# Altium PCB Fast_Servo.PCBDOC (part 8 of 11)
Units mm, origin at the board's own origin, x right, y up, seen from the top; angles counter-clockwise.
Board outline 162.48 x 100 mm, 6 copper layers (Top, GP1(GND), L3, L4, P3V3, Bot), stack 1.716 mm thick; 668 components, 491 nets, 2308 pads, 1133 vias.
Unrouted connection lines stored in the file: 2.
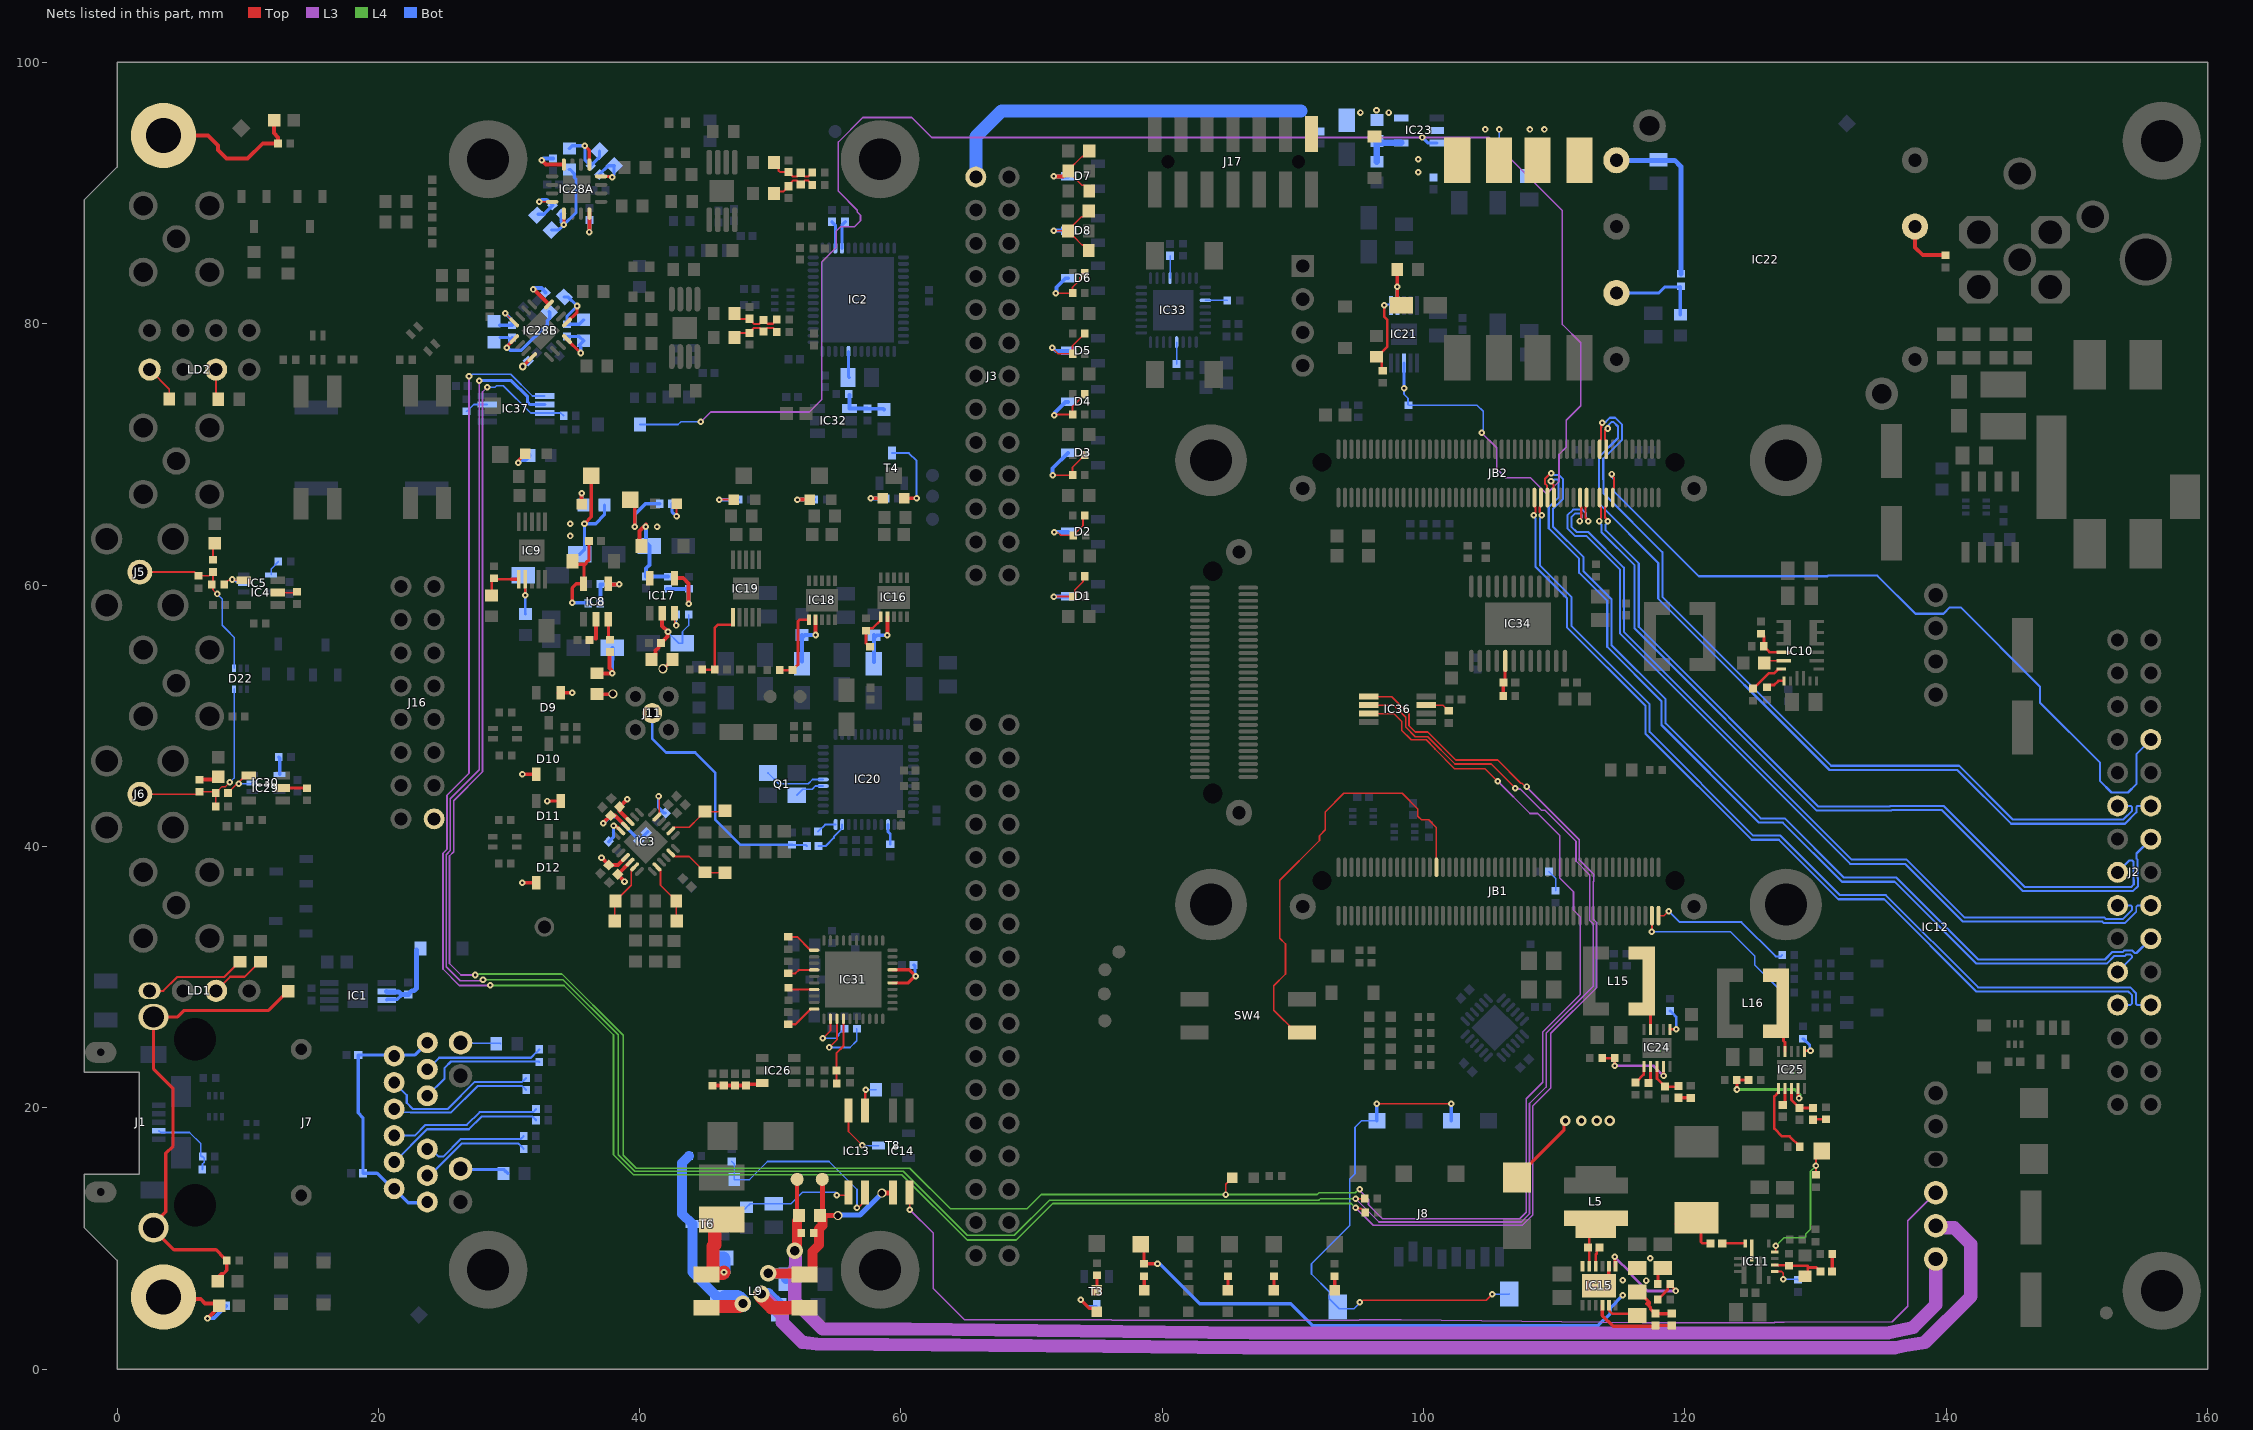
[diagram p10: the nets of this part, all layers, seen from the top]

## Via types
v1: diameter 0.5, hole 0.2, Top to Bot, tented both sides, 1045 vias
v2: diameter 0.8, hole 0.4, Top to Bot, tented both sides, 40 vias
v3: diameter 0.6, hole 0.3, Top to Bot, tented both sides, 27 vias
v4: diameter 1.27, hole 0.711, Top to Bot, tented both sides, 11 vias
v5: diameter 0.7, hole 0.5, Top to Bot, tented both sides, 10 vias

## Nets (pads, with @x,y where several pads share a name; then routed paths per layer and width w, separated by ;. In a path a pad name is that pad's centre, name@x,y a point inside that pad or via, vN(x,y) a via of type N, cw(c..) or ccw(c..) an arc to the next point about the centre after c; other vN are vias at no path point) (continued)
LVDS2_P: J2.8 JB2.86 | length 59
  Top w0.16: v1(114.39,68.503) 114.39,68.414 114.564,68.24 114.564,67.736 114.569,67.731 114.569,67.602 114.569,67.438 114.475,67.344 JB2.86@114.475,66.704
  Bot w0.16: v1(114.39,68.503) 114.39,68.283 114.557,68.116 114.557,67.19 121.067,60.68 130.911,60.68 130.961,60.729 134.726,60.729 137.645,57.81 139.791,57.81 140.279,58.298 141.101,58.298 147.177,52.222 147.177,51.012 151.754,46.435 151.754,45.021 152.645,44.13 153.908,44.13 154.545,44.767 154.545,47.069 J2.8@155.654,48.178
LVDS3_N: J2.12 JB2.83 | length 64.1
  Top w0.16: v1@113.885,71.895 113.885,71.132 113.975,71.042 JB2.83@113.975,70.404
  Bot w0.16: v1(114.104,71.988) 114.17,72.053 114.17,72.27 114.391,72.492 114.523,72.492 114.877,72.138 114.877,71.26 113.43,69.813 113.43,67.97 113.432,67.968 113.432,66.214 117.954,61.692 117.954,58.966 131.065,45.855 140.847,45.855 144.964,41.738 152.43,41.738 153.678,41.738 154.544,42.605 154.544,43.005 154.638,43.098 J2.12@155.654,43.098
LVDS3_P: J2.11 JB2.81 | length 64.4
  Top w0.16: JB2.81@113.475,70.404 113.475,71.042 113.565,71.132 113.565,72.027 113.596,72.058 113.596,72.367 v1(113.661,72.432)
  Bot w0.16: v1(113.661,72.432) 113.726,72.497 113.943,72.497 114.258,72.812 114.656,72.812 115.197,72.271 115.197,71.128 113.75,69.681 113.75,68.103 113.752,68.101 113.752,67.051 118.274,62.529 118.274,59.099 131.198,46.175 140.98,46.175 145.097,42.058 152.563,42.058 153.545,42.058 154.224,42.738 154.224,43.005 154.131,43.098 J2.11@153.114,43.098
LVDS4_N: J2.15 JB2.84 | length 60.8
  Top w0.16: JB2.84@113.975,66.704 113.975,66.066 113.885,65.976 113.885,65.171 114.1,64.956 v1(114.1,64.9)
  Bot w0.16: v1(114.1,64.9) 114.1,64.809 113.927,64.636 113.927,64.198 116.465,61.66 116.465,56.808 130.215,43.058 135.668,43.058 135.709,43.098 139.804,43.098 146.003,36.9 154.15,36.9 154.35,37.1 154.35,37.446 154.327,37.469 154.327,38.837 154.234,38.931 154.027,38.931 J2.15@153.114,38.018
LVDS4_P: J2.14 JB2.82 | length 62.4
  Top w0.16: v1(113.435,64.904) 113.435,64.996 113.565,65.127 113.565,65.976 113.475,66.066 JB2.82@113.475,66.704
  Bot w0.16: v1(113.435,64.904) 113.435,64.813 113.607,64.641 113.607,64.065 116.145,61.528 116.145,56.676 130.083,42.738 135.8,42.738 135.841,42.778 139.672,42.778 145.87,36.58 154.283,36.58 154.67,36.967 154.67,37.579 154.647,37.601 154.647,38.98 154.559,39.069 154.559,39.463 J2.14@155.654,40.558
LVDS5_N: J2.18 JB2.78 | length 66.2
  Top w0.16: JB2.78@112.475,66.704 112.475,66.066 112.385,65.976 112.385,65.171 112.6,64.956 v1(112.6,64.9)
  Bot w0.152: v1(112.6,64.9) 112.6,64.986 112.423,65.163 112.423,65.512 112.152,65.784 111.444,65.784 110.996,65.336 110.996,64.349 111.592,63.753 112.472,63.753 115.013,61.212 115.013,56.306 132.644,38.674 136.843,38.674 141.263,34.254 151.947,34.254 152.063,34.138 153.669,34.138 154.54,35.009 154.54,35.389 154.629,35.478 J2.18@155.654,35.478
  Bot w0.16: v1@112.6,64.853 v1(112.6,64.9)
LVDS5_P: J2.17 JB2.76 | length 64.1
  Top w0.16: v1(111.935,64.904) 111.935,64.996 112.065,65.127 112.065,65.976 111.975,66.066 JB2.76@111.975,66.704
  Bot w0.152: v1(111.935,64.904) 111.935,64.991 112.111,65.168 112.111,65.382 112.022,65.472 111.573,65.472 111.308,65.206 111.308,64.478 111.721,64.065 112.601,64.065 115.325,61.341 115.325,56.435 132.774,38.986 136.973,38.986 141.392,34.566 152.076,34.566 152.192,34.45 153.54,34.45 154.228,35.139 154.228,35.389 154.139,35.478 J2.17@153.114,35.478
  Bot w0.16: v1@111.935,64.812 v1(111.935,64.904)
LVDS6_N: J2.21 JB2.68 | length 70.2
  Top w0.16: v1(109.75,67.95) 109.75,67.858 109.948,67.66 109.948,66.731 JB2.68@109.975,66.704 JB2.68@110.002,66.731
  Bot w0.16: v1(109.75,67.95) 109.842,67.95 109.99,68.098 110.24,68.098 110.334,68.004 110.334,66.719 109.575,65.96 109.575,64.355 111.905,62.025 111.905,60.945 114.055,58.795 114.055,55.27 118.205,51.12 118.205,49.292 125.672,41.825 127.497,41.825 132.022,37.3 136.047,37.3 142.316,31.031 152.276,31.031 152.857,31.611 153.664,31.611 153.768,31.715 154.111,31.715 154.205,31.622 154.205,31.489 J2.21@153.114,30.398
LVDS6_P: J2.20 JB2.66 | length 71.3
  Top w0.16: JB2.66@109.461,66.718 JB2.66@109.475,66.704 109.448,66.731 109.448,67.606 109.293,67.761 109.293,68.139 109.731,68.577 v1(109.757,68.577)
  Bot w0.16: v1(109.757,68.577) 109.849,68.577 110.008,68.418 110.373,68.418 110.654,68.137 110.654,66.586 109.895,65.828 109.895,64.488 112.225,62.158 112.225,61.078 114.375,58.928 114.375,55.403 118.525,51.253 118.525,49.425 125.805,42.145 127.63,42.145 132.155,37.62 136.18,37.62 142.449,31.351 152.144,31.351 152.724,31.931 153.532,31.931 153.635,32.035 154.244,32.035 154.431,31.848 154.564,31.848 J2.20@155.654,32.938
LVDS7_N: J2.24 JB2.64 | length 69.1
  Top w0.16: JB2.64@108.975,66.704 108.975,66.066 108.885,65.976 108.885,65.613 109.05,65.447 v1(109.05,65.355)
  Bot w0.16: v1(109.05,65.355) 109.05,65.263 108.897,65.11 108.897,61.515 111.308,59.104 111.308,56.884 117.301,50.892 117.301,48.765 125.233,40.833 127.317,40.833 131.871,36.278 135.379,36.278 142.445,29.212 148.479,29.212 148.485,29.218 153.678,29.218 153.684,29.212 154.083,29.212 154.52,28.775 154.52,27.975 154.637,27.858 J2.24@155.654,27.858
LVDS7_P: J2.23 JB2.62 | length 69
  Top w0.16: v1(108.423,65.355) 108.423,65.447 108.565,65.589 108.565,65.976 108.475,66.066 JB2.62@108.475,66.704
  Bot w0.16: v1(108.423,65.355) 108.423,65.263 108.577,65.11 108.577,61.383 110.988,58.972 110.988,56.752 116.981,50.759 116.981,48.632 125.1,40.513 127.184,40.513 131.739,35.958 135.247,35.958 142.313,28.892 148.612,28.892 148.618,28.898 153.545,28.898 153.551,28.892 153.95,28.892 154.2,28.642 154.2,27.975 154.083,27.858 J2.23@153.114,27.858
MIO0: J8.9 | length 39.9
  Top w0.125: v1(95.116,5.129) 95.217,5.129 95.359,5.27 104.79,5.27 v1(105.25,5.73) ; v1(96.42,20.32) v1(102.12,20.32)
  Bot w0.125: v1(95.116,5.129) 95.116,5.056 94.676,4.617 93.553,4.617 92.783,5.388 92.783,5.915 91.42,7.277 91.42,8.059 94.353,10.991 94.353,14.547 94.75,14.944 94.75,18.5 95.25,19 J8.9@96.42,19 ; v1(105.25,5.73) 106.53,5.73 J8.9@106.55,5.75
  Bot w0.25: J8.9@96.42,19 v1(96.42,20.32) ; J8.9@102.12,19 v1(102.12,20.32)
MODE: JB1.31 SW4.3 | length 33.6
  Top w0.125: SW4.3@90.707,25.757 90.243,25.757 88.529,27.471 88.529,29.331 89.431,30.232 89.431,32.539 88.993,32.977 88.993,37.413 92.029,40.449 92.029,40.826 92.475,41.271 92.475,42.641 93.896,44.062 98.359,44.062 99.549,42.873 99.549,42.322 99.835,42.037 100.385,42.037 100.975,41.447 JB1.31@100.975,38.404
N2V5A: C56.1 C57.2 C59.2 C64.1 C65.2 C67.2 C101.2 C102.2 D9.1 D10.1 D11.1 D12.1 D24.2 IC3.15 IC3.16 IC3.21 IC3.22 IC8.5 R111.2 R126.2 TP8.1 | length 34.8
  Top w0.254: v1(31.025,37.225) D12.1@32.075,37.225 ; v1(31.03,45.521) D10.1@32.08,45.521 ; v1(32.925,43.475) D11.1@33.975,43.475 ; D9.1@33.78,51.771 33.98,51.971 D9.1@33.98,51.771 ; D9.1@34.18,51.771 v1(34.847,51.771) ; v1(34.849,58.649) 34.849,59.785 35.159,60.095 IC8.5@35.703,60.095 35.742,60.134 35.742,61.558 35.693,61.607 35.072,61.607 D24.2@34.853,61.825 ; 35.78,61.607 35.845,61.607 35.928,61.69 35.928,61.755 36.125,61.952 36.125,63.359 C102.2@36.135,63.369 ; v1(35.78,64.706) 36.302,65.228 TP8.1@36.302,68.3
  Top w0.3: v1(37.08,39.145) 37.08,39.139 37.636,38.582 C59.2@37.636,38.576 38.343,38.576 IC3.21@38.916,39.148 ; v1(37.203,41.767) 37.203,41.779 C57.2@37.787,42.363 38.105,42.363 IC3.16@38.916,41.552 ; C65.2@38.284,37.877 v1@38.84,37.321 ; C65.2@38.317,37.873 38.335,37.873 39.257,38.794 IC3.22@39.269,38.794 ; v1(39.059,43.6) 39.042,43.6 38.476,43.035 C67.2@38.458,43.035 38.458,42.716 IC3.15@39.269,41.906
  Bot w0.254: v1(34.849,58.649) R126.2@36.267,58.649 ; C101.2@35.405,62.373 35.78,62.749 v1(35.78,64.706) 36.642,64.706 37.303,65.367 R111.2@37.303,66.129 ; v1@37.215,41.756 37.744,42.285 38.183,42.285 39.979,40.489 C64.1@40.615,41.125
  other v1: 38.84,37.314 34.7,63.761 34.7,64.706
N5V0A: C37A.2 C37B.2 C51A.2 C51B.2 C139.2 C140.2 D27.2 IC17.5 IC28A.4 IC28A.12 IC28B.4 IC28B.12 R113.2 R166.2 TP9.1 | length 22.9
  Top w0.3: v3@31.044,76.705 v3@31.044,76.715 ; v3(31.05,76.725) 31.044,76.719 v3@31.044,76.715 ; IC28B.12@31.783,77.455 v3@31.044,76.715 ; v1(31.852,82.629) 31.912,82.629 IC28B.4@33.056,81.485 ; v1(32.52,92.512) 32.845,92.187 IC28A.4@34.202,92.187 ; v1(36.152,87.022) IC28A.12@36.152,88.437 ; TP9.1@39.278,66.541 39.625,66.194 v1(39.625,64.456) ; D27.2@40,63 40,64.152 40.478,64.63 v1(40.478,64.456)
  Bot w0.3: v3@31.057,76.718 31.593,77.254 C37B.2@31.653,77.254 ; v1(31.852,82.629) 31.951,82.728 32.473,82.728 32.788,82.414 C51B.2@32.788,82.392 ; v1(32.52,92.512) 32.647,92.639 C51A.2@33.371,92.639 ; v1(36.152,87.022) C37A.2@36.152,87.955 ; v1(39.625,64.456) 39.625,65.402 40.454,66.231 R113.2@41.529,66.231 ; v1(40.478,64.456) 40.478,63.266 C139.2@40.749,62.995 40.749,61.54 40.499,61.29 C140.2@40.499,60.66 42.169,60.66 R166.2@42.174,60.655
  other v1: 41.332,64.456
N5V5: C103.1 C114.1 C192.2 C193.2 C201.1 D25.2 IC15.8 IC15.12 IC15.13 L18.1 L19.1 R109.2 R130.1 TP7.1 | length 57.5
  Top w0.25: TP7.1@78.581,9.835 TP7.1@78.598,9.818 ; TP7.1@78.601,10.008 R109.2@78.601,8.062 v1(79.632,8.062)
  Top w0.254: L18.1@36.741,51.659 37.937,51.659 v5@37.977,51.699 ; v5(41.785,53.602) 41.847,53.602 42.511,54.267 L19.1@42.511,54.317 ; D25.2@107.153,14.65 107.153,14.725 110.746,18.317 110.746,18.896 v2(110.85,19) ; IC15.13@113.425,6.37 114.175,7.12 IC15.8@114.175,7.87 ; C103.1@116.35,5.895 116.5,5.895 117.263,5.132 117.263,4.997 ; 117.075,4.997 117.105,4.997 117.359,4.742 117.359,4.622 C201.1@117.737,4.243 C114.1@118.987,4.243 ; R130.1@117.932,6.5 117.932,7.377 C193.2@118.3,7.745 118.397,7.745 C193.2@118.795,7.347
  Bot w0.254: v1(79.632,8.062) 79.81,8.062 82.871,5 89.825,5 91.51,3.315 113.342,3.315 114.273,4.245 114.273,4.668 v1(115.25,5.645)
  other v1: 117.028,6.778 115.25,6.799 117.359,8.47
  other v2: 112.081,19 113.25,19 114.25,19
  other v5: 37.957,51.679
N5V5_LDO2: C99.2 C100.2 IC8.2 L18.2 R125.1 | length 6.1
  Top w0.3: 36.635,55.904 36.644,55.914 36.644,57.386 IC8.2@36.653,57.395 ; L18.2@37.055,53.243 v1(37.898,53.243) 37.921,53.408 37.676,53.653 R125.1@37.676,54.947
  Bot w0.3: v1(37.898,53.243) 37.921,55.188 C100.2@37.903,55.206
N5V5_LDO5: C137.2 C138.2 IC17.2 L19.2 R165.1 | length 8.2
  Top w0.3: L19.2@40.886,54.479 41.023,54.479 41.211,54.667 41.211,54.981 41.464,55.234 41.464,55.401 C137.2@41.624,55.561 ; C137.2@41.724,55.661 C137.2@41.624,55.561 ; IC17.2@41.724,57.835 41.724,56.884 v1(42.169,56.439) 42.131,56.4 42.131,56.067 C137.2@41.624,55.561
  Bot w0.125: v1(42.169,56.439) 42.169,56.381 43,55.55 C138.2@43.275,55.55 43.275,56.443 43.744,56.912 R165.1@43.744,57.737
N12V0A: C182.2 C183.2 D29.2 IC23.5 J3.26 J16.16 R180.2 | length 28.8
  Bot w1: J3.26@65.73,91.24 65.73,94.318 67.687,96.275 90.599,96.275
  other v1: 95.167,96.169 97.317,96.169 96.393,96.342
N13V0: C180.2 C181.2 IC23.2 L14.2
  other v1: 99.575,91.61 99.58,92.58
N13V0FIL: C178.2 C179.2 L13.2 L14.1 | length 3
  Bot w0.125: C179.2@105.672,91.869 105.775,91.972 v1(105.775,94.875)
  other v1: 104.73,94.875 108.14,94.875 109.25,94.875
N13V0S: C177.2 IC22.4 L13.1 R179.1 | length 13.4
  Bot w0.381: IC22.4@114.75,92.516 119.216,92.516 119.7,92.032 R179.1@119.7,83.826
NC: J17.1
NetB1_1: B1.1 C122.2 IC14.1 L9.4 R145.1 R147.1 | length 18.3
  Top w0.381: B1.1@53.976,14.525 53.989,14.513 53.989,11.772 54.001,11.76 54.009,11.752 v5(55.175,11.752) ; v5(58.54,13.464) 59.342,13.464 IC14.1@59.381,13.503
  Top w0.762: v4@49.682,7.305 52.56,7.305 L9.4@52.62,7.244 53.02,7.244 53.239,7.463 53.239,8.992 53.735,9.488 53.735,10.735 54.001,11.001 R147.1@54.001,11.531
  Bot w0.381: v5(55.175,11.752) 55.214,11.79 56.867,11.79 58.507,13.431 v5(58.54,13.464)
  Bot w0.762: v4@50.153,7.312 50.999,7.312 51.193,7.118 C122.2@51.193,6.891
  other v4: 49.835,7.332
NetB2_1: B2.1 IC12.1 R145.2 R147.2 | length 101.4
  Top w0.3: R147.2@52.056,11.816 B2.1@52.056,14.525
  Top w0.762: v4@52.057,8.986 R147.2@52.057,11.351
  L3 w1.016: 51.873,7.704 51.873,5.198 54.005,3.066 60.675,3.066 86.748,2.769 86.753,2.769 135.576,2.769 135.685,2.793 137.464,3.189 139.2,4.925 IC12.1@139.2,8.425 ; v4(51.873,9.068) 51.921,9.019 51.921,7.704
NetC1_2: C1.2 D30.1 IC1.2 IC1.3 | length 6.8
  Bot w0.254: IC1.3@20.643,28.256 20.687,28.3 21.45,28.3 21.775,28.625
  Bot w0.381: IC1.2@20.643,28.906 20.678,28.872 21.553,28.872 21.744,28.681 C1.2@22.293,28.681 22.568,28.956 22.734,28.956 22.919,29.141 D30.1@22.919,32.067
NetC4_2: C4.2 IC31.34 R19.2 | length 5.2
  Top w0.16: R19.2@55.071,21.872 55.071,22.825 C4.2@55.051,22.845 55.051,24.175 55.601,24.725 IC31.34@55.601,26.805
NetC5_2: C5.2 IC31.5 IC31.7 | length 4.9
  Top w0.25: IC31.5@59.351,29.555 60.563,29.555 61.065,30.057 v1(61.128,30.057) 60.63,30.555 IC31.7@59.351,30.555
  Bot w0.25: C5.2@60.971,30.93 61.08,30.821 61.08,30.105 v1(61.128,30.057)
NetC6_2: C6.2 C9.2 C10.2 IC26.3 R21.2 | length 3.9
  Top w0.3: R21.2@45.58,21.695 48.141,21.695 48.249,21.803 49.285,21.803 IC26.3@49.382,21.901
NetC18_2: C18.2 D7.3 R37.2 R38.1 | length 7
  Top w0.125: R37.2@72.809,91.65 73.86,90.599 74.022,90.599 74.409,90.212 R38.1@74.409,90.162 ; R37.2@72.809,91.7 72.809,91.75 73.86,92.8 73.997,92.8 74.409,93.213 C18.2@74.409,93.238
  Top w0.3: v1(71.684,91.285) 72.395,91.285 72.459,91.35 72.509,91.35 72.809,91.65 R37.2@72.809,91.7
  Bot w0.3: v1(71.684,91.285) D7.3@72.784,91.285
NetC19_2: C19.2 D8.3 R35.2 R36.1 | length 6.8
  Top w0.125: v1(71.684,87.135) 71.705,87.115 R35.2@72.777,87.115 ; R36.1@74.377,85.594 74.377,85.644 73.989,86.031 73.86,86.031 73.214,86.677 73.164,86.677 72.777,87.065 R35.2@72.777,87.115 ; C19.2@74.377,88.635 74.377,88.61 73.964,88.198 73.81,88.198 72.777,87.165 R35.2@72.777,87.115
  Bot w0.3: v1(71.684,87.135) D8.3@72.784,87.135
NetC20_1: C20.1 IC2.17 | length 2.1
  Bot w0.25: C20.1@54.717,87.807 54.984,87.54 IC2.17@54.984,85.788
NetC21_1: C21.1 IC2.18 | length 2.1
  Bot w0.25: IC2.18@55.484,85.788 55.484,87.54 C21.1@55.751,87.807
NetC25_2: C25.2 IC2.48 | length 2
  Bot w0.25: IC2.48@55.984,77.888 55.984,75.933 C25.2@56.034,75.883
NetC34_2: C34.2 C35.2 IC32.4 R39.1 | length 3.7
  Bot w0.3: R39.1@56.045,74.55 56.045,73.555 IC32.4@56.075,73.525 56.087,73.512 57.412,73.512 C35.2@57.425,73.5 58.641,73.5 C34.2@58.698,73.443
NetC40A_1: C40A.1 IC28A.1 R44A.1 R48A.2 | length 6
  Top w0.25: v1(35.81,93.622) 36.152,93.279 IC28A.1@36.152,92.187
  Bot w0.25: R48A.2@34.621,93.414 34.828,93.622 v1(35.81,93.622) 35.81,92.54 R44A.1@36.256,92.093 36.925,92.761 C40A.1@36.925,93.228
NetC40A_2: C40A.2 IC28A.16 R44A.2 | length 3.2
  Top w0.25: IC28A.16@37.052,91.287 37.062,91.278 37.751,91.278 37.826,91.203 v1(37.894,91.203)
  Bot w0.25: R44A.2@36.921,91.428 37.589,92.096 C40A.2@38.056,92.096 38.038,92.079 38.038,91.415 37.894,91.271 v1(37.894,91.203)
NetC40B_1: C40B.1 IC28B.1 R44B.1 R48B.2 | length 6
  Top w0.25: IC28B.1@34.435,80.106 35.207,80.879 v1(35.207,81.363)
  Bot w0.25: R48B.2@34.219,82.057 34.513,82.057 v1(35.207,81.363) 34.442,80.598 R44B.1@34.442,79.966 35.387,79.966 C40B.1@35.717,80.296
NetC40B_2: C40B.2 IC28B.16 R44B.2 | length 4
  Top w0.25: IC28B.16@34.435,78.833 v1@35.502,77.766
  Bot w0.25: R44B.2@34.442,79.026 35.387,79.026 C40B.2@35.717,78.696 35.386,78.365 35.502,78.249 v1(35.502,77.765)
NetC41A_1: C41A.1 C43A.2 R47A.1 R201A.2 | length 3.7
  Top w0.16: R201A.2@50.275,89.987 50.428,90.14 51.015,90.14 51.266,90.391 C41A.1@51.266,90.499 ; C41A.1@51.4,90.525 51.63,90.755 51.63,90.86 51.724,90.954 52.04,90.954 C43A.2@52.33,90.664 52.625,90.959 52.821,90.959 52.824,90.956 52.917,90.956 53.215,90.657 R47A.1@53.215,90.637
NetC41B_1: C41B.1 C43B.2 R47B.1 R201B.2 | length 3.9
  Top w0.16: R201B.2@47.265,78.957 47.613,79.305 C41B.1@48.422,79.305 48.652,79.535 48.652,79.595 48.736,79.679 49.196,79.679 C43B.2@49.475,79.4 49.76,79.685 50.206,79.685 50.495,79.397 R47B.1@50.495,79.377
NetC43A_1: C43A.1 C45A.2 R52A.1 R203A.2 | length 3.9
  Top w0.16: R203A.2@50.275,92.362 50.62,92.017 50.62,91.737 50.754,91.603 C45A.2@51.4,91.603 51.63,91.373 51.63,91.368 51.724,91.274 52.04,91.274 C43A.1@52.33,91.564 52.625,91.269 52.817,91.269 52.824,91.276 52.917,91.276 53.215,91.575 R52A.1@53.215,91.595
NetC43B_1: C43B.1 C45B.2 R52B.1 R203B.2 | length 4
  Top w0.16: R203B.2@47.265,80.793 47.265,80.753 47.635,80.383 C45B.2@48.422,80.383 48.652,80.153 48.652,80.093 48.746,79.999 49.174,79.999 C43B.1@49.475,80.3 49.77,80.005 50.185,80.005 50.495,80.314 R52B.1@50.495,80.334
NetC44A_1: C44A.1 IC28A.9 R48A.1 R55A.1 | length 7.6
  Top w0.25: IC28A.9@34.202,88.437 34.203,88.436 v1(34.205,87.581) v1(34.205,87.581)
  Bot w0.25: C44A.1@33.265,87.182 33.76,87.182 33.858,87.28 33.904,87.28 v1(34.205,87.581) ; 34.004,87.782 v1(34.205,87.581) ; 34.004,87.903 34.004,88.144 R55A.1@34.004,88.405 ; R48A.1@34.621,91.814 34.671,91.814 34.996,91.489 34.996,91.2 35.127,91.069 35.127,88.503 v1(34.205,87.581)
NetC44A_2: C44A.2 IC28A.8 R55A.2 | length 3.6
  Top w0.125: v1(32.329,89.336) v1(32.329,89.336) IC28A.8@33.302,89.337
  Bot w0.25: C44A.2@32.222,88.384 32.653,88.384 R55A.2@33.339,89.07 32.915,89.494 32.487,89.494 v1(32.329,89.336)
NetC44B_1: C44B.1 IC28B.9 R48B.1 R55B.1 | length 7.5
  Top w0.25: v1(29.82,78.181) 29.82,78.235 30.404,78.82 IC28B.9@30.404,78.833
  Bot w0.25: C44B.1@29.316,78.946 29.931,78.946 ; R55B.1@30.241,78.951 30.103,78.813 30.103,78.533 29.82,78.249 v1(29.82,78.181) 29.887,78.181 30.098,77.97 30.952,77.97 32.919,79.938 32.919,80.226 33.123,80.43 33.123,80.89 R48B.1@33.088,80.925
NetC44B_2: C44B.2 IC28B.8 R55B.2 | length 3.1
  Top w0.125: v1(29.715,80.793) 29.717,80.793 IC28B.8@30.404,80.106
  Bot w0.25: C44B.2@29.271,79.891 R55B.2@30.241,79.891 30.241,80.267 v1(29.715,80.793)
NetC50_1: C50.1 IC15.11 L5.1 | length 4.8
  Top w0.203: IC15.11@112.675,7.87 112.675,9.213 C50.1@112.568,9.32 112.621,9.374 112.675,9.427 112.675,10.4 112.125,10.95 112.125,11.052 112.623,11.55 L5.1@113.175,11.55
NetC50_2: C50.2 IC15.10 | length 1.6
  Top w0.203: IC15.10@113.175,7.87 113.175,8.775 113.259,8.859 113.259,9.112 C50.2@113.468,9.32
NetC53_2: C53.2 IC3.8 R59.2 | length 4.8
  Top w0.125: IC3.8@42.38,41.198 42.654,41.472 43.791,41.472 44.575,42.257 44.588,42.257 R59.2@44.999,42.668 46.484,42.668 C53.2@46.537,42.721
NetC55_2: C55.2 IC3.5 R67.2 | length 3.8
  Top w0.125: IC3.5@42.654,39.228 43.791,39.228 R67.2@44.575,38.443 ; R67.2@44.999,38.027 45.052,37.974 C55.2@46.537,37.974
NetC61_2: C61.2 IC3.2 R69.2 | length 3.7
  Top w0.125: IC3.2@41.594,38.167 41.594,37.031 R69.2@42.378,36.246 ; C61.2@42.789,34.337 R69.2@42.789,35.822
NetC63_2: C63.2 IC3.23 R77.2 | length 4.8
  Top w0.125: C63.2@38.096,34.284 38.096,35.769 39.357,37.031 39.357,38.175 IC3.23@39.623,38.441
NetC69_2: C69.2 R80.1 | length 1.3
  Top w0.125: R80.1@7.35,61.944 7.35,63.085 C69.2@7.475,63.21
NetC72_2: C72.2 R82.1 | length 1.5
  Top w0.3: R82.1@6.325,45.12 7.516,45.12 C72.2@7.736,45.34
NetC74_1: C74.1 C76.1 J7.19 J7.20 R86.2 | length 37.2
  Top w0.25: J7.19@2.715,10.77 4.36,9.125 7.58,9.125 8.22,8.485 8.24,8.485 8.405,8.32 8.405,7.555 8.15,7.3 7.975,7.3 7.575,6.9 C76.1@7.575,6.725 ; J7.19@2.795,10.82 2.795,11.089 3.739,12.033 3.739,16.519 4.29,17.07 4.29,21.467 2.795,22.962 J7.20@2.795,26.95 4.638,26.95 5.139,27.45 11.6,27.45 12.925,28.775 C74.1@13.1,28.775
NetC75_2: C75.2 C77.1 J7.1 J7.6 J7.7 J7.12 | length 20.6
  Bot w0.254: J7.7@23.67,12.74 22.295,12.74 21.275,13.76 21.13,13.76 19.9,14.99 C75.2@18.824,14.99 18.824,19.239 18.459,19.604 C77.1@18.459,24.036 22.775,24.036 J7.12@23.67,24.931
NetC82_1: C82.1 R116.2 ST1.1 | length 12.1
  Top w0.3: ST1.1@3.556,94.412 6.979,94.412 7.736,93.654 7.736,93.3 8.392,92.644 9.998,92.644 11.154,93.8 R116.2@12.32,93.8 12.32,94.268 12,94.588 12,95.465 C82.1@11.89,95.575
NetC83_1: C83.1 R117.2 ST1.0 | length 7.5
  Top w0.3: ST1.0@3.556,5.512 3.718,5.35 6.41,5.35 6.735,5.025 C83.1@7.434,5.025 ; v1(6.925,3.875) 7.9,4.85 C83.1@7.675,4.85
  Bot w0.3: v1(6.925,3.875) 6.963,3.913 7.437,3.913 8.354,4.83 R117.2@8.354,4.85
NetC84_2: C84.2 IC33.20 | length 1.7
  Bot w0.125: IC33.20@80.596,83.493 C84.2@80.596,85.208
NetC85_2: C85.2 IC33.4 | length 1.7
  Bot w0.125: IC33.4@81.096,78.593 81.096,76.921 C85.2@81.098,76.919
NetC97_2: C97.2 IC34.17 R22.1 | length 2.8
  Top w0.254: R22.1@106.085,51.522 106.099,51.536 106.099,52.525 C97.2@106.113,52.539 106.232,52.658 106.232,54.186 IC34.17@106.25,54.205
NetC103_2: C103.2 IC15.5 | length 2.7
  Top w0.203: IC15.5@114.175,4.87 114.223,4.822 114.223,4.451 114.431,4.243 116.202,4.243 C103.2@116.35,4.095
NetC110_1: C110.1 IC9.7 R134.2 | length 3.9
  Top w0.203: IC9.7@31.245,60.449 31.25,60.444 v1(31.25,59.225)
  Bot w0.203: C110.1@31.245,60.436 31.25,60.431 v1(31.25,59.225) 31.25,57.805 31.245,57.8 R134.2@31.258,57.788
NetC114_2: C114.2 C201.2 IC15.4 | length 6.5
  Top w0.25: IC15.4@113.675,4.87 113.675,4.095 114.5,3.27 117.664,3.27 C201.2@117.737,3.343 C114.2@118.987,3.343
NetC115_1: C115.1 IC11.6 L6.1 | length 5.5
  Top w0.203: L6.1@119.307,11.097 120.623,11.097 121.223,10.497 121.223,9.739 121.342,9.62 C115.1@121.957,9.62 ; L6.1@119.532,10.497 120.63,11.595 L6.1@120.882,11.595
NetC115_2: C115.2 IC11.7 | length 1.8
  Top w0.203: C115.2@122.857,9.62 IC11.7@124.607,9.62
NetC123_1: C123.1 L9.2 R149.2 T6.3 | length 16.9
  Top w1.016: L9.2@45.099,4.774 45.121,4.796 47.616,4.796 47.835,5.016 v4(47.904,5.016)
  Bot w0.762: R149.2@43.78,16.3 43.25,15.77 43.25,11.88 T6.3@44.037,11.093 44.037,7.418 45.957,5.497 C123.1@46.282,5.497
  Bot w1.27: C123.1@46.547,5.437 47.484,5.437 v4(47.904,5.016)
NetC123_2: C123.2 L8.2 L9.1 | length 7.1
  Top w1.016: L9.1@45.12,7.244 45.212,7.336 46.376,7.336 v1(46.457,7.417) ; L9.1@45.58,7.305 45.612,7.336 45.612,9.391 45.747,9.527 45.747,10.964 46.239,11.456 L8.2@46.279,11.456
  Bot w1.016: C123.2@46.282,8.497 46.39,8.497 46.457,8.43 v1(46.457,7.417)
NetC126_2: C126.2 IC13.3 R150.2 T6.1 | length 10.5
  Top w0.127: v1(55.091,13.312) 55.792,13.312 IC13.3@55.984,13.503
  Bot w0.127: T6.1@46.337,12.043 46.573,12.28 48.081,12.28 R150.2@48.184,12.382 48.453,12.652 C126.2@50.254,12.652 51.587,12.652 52.463,13.528 55.038,13.528 55.038,13.365 v1(55.091,13.312)
NetC127_2: C127.2 IC12.2 L9.3 | length 109.1
  Top w1.016: v4(49.299,5.75) 49.348,5.701 49.348,5.452 50.096,4.704 L9.3@52.62,4.704
  L3 w1.016: v4(49.299,5.75) 50.909,4.14 50.909,3.588 52.449,2.048 53.532,1.925 75.536,1.75 86.281,1.628 136.048,1.628 136.68,1.764 138.373,2.048 141.875,5.55 141.875,9.55 140.61,10.815 139.35,10.815 IC12.2@139.2,10.965
  Bot w1.016: v4(49.299,5.75) 49.348,5.701 49.816,5.701 50.646,4.872 C127.2@50.646,4.547
NetC136_1: C136.1 IC16.7 R164.2 | length 4.5
  Top w0.3: IC16.7@58.958,57.522 58.956,57.52 58.963,57.513 v1(58.963,56.164)
  Bot w0.3: C136.1@57.923,54.122 R164.2@57.923,56.168 58.036,56.055 58.144,56.164 v1(58.963,56.164)
NetC144_1: C144.1 IC18.7 R169.2 | length 4.5
  Top w0.3: IC18.7@53.457,57.541 53.455,57.539 53.457,57.537 53.461,57.532 53.461,57.343 v1(53.461,56.183)
  Bot w0.3: C144.1@52.422,54.142 R169.2@52.422,56.188 52.535,56.075 52.643,56.183 v1(53.461,56.183)
NetC166_1: C166.1 IC21.7 R175.2 | length 4.4
  Top w0.25: R175.2@98.05,84.156 97.975,84.081 v1(97.975,82.848) 97.975,81.727 C166.1@98.292,81.411
  Bot w0.25: v1(97.975,82.848) 97.987,82.835 97.987,81.413 IC21.7@98,81.4
NetC184_2: C184.2 IC24.7 | length 1.3
  Top w0.203: C184.2@117.218,21.902 117.362,22.046 IC24.7@117.362,23.158
NetC185_1: C185.1 R187.2 | length 1
  Top w0.25: C185.1@119.494,20.769 119.504,20.759 120.434,20.759 R187.2@120.444,20.749
NetC185_2: C185.2 C186.2 IC24.8 | length 2.8
  Top w0.203: IC24.8@117.862,23.158 117.862,22.229 C186.2@118.469,21.622 119.447,21.622 C185.2@119.494,21.669
NetC188_1: C188.1 R193.1 | length 1.7
  Bot w0.125: C188.1@109.6,38.075 110.1,37.575 R193.1@110.1,36.62
NetC194_2: C194.2 IC25.7 | length 1.3
  Top w0.203: C194.2@127.485,20.211 127.655,20.381 IC25.7@127.655,21.473
NetC195_1: C195.1 R206.2 | length 1
  Top w0.203: C195.1@129.81,19.083 129.837,19.111 R206.2@130.785,19.111
NetC195_2: C195.2 C196.2 IC25.8 | length 2.8
  Top w0.203: IC25.8@128.155,21.473 128.155,20.608 C196.2@128.78,19.983 C195.2@129.81,19.983
NetC198_1: C198.1 IC11.2 R142.2 R208.1 | length 4.5
  Top w0.203: IC11.2@126.877,7.97 126.9,7.947 127.916,7.947 R142.2@127.96,7.902 127.962,7.9 128.127,7.9 129.395,7.9 129.395,7.78 ; R208.1@129.179,7.1 129.395,7.316 129.395,7.78 ; C198.1@130.365,7.47 130.055,7.78 129.395,7.78
NetC198_2: C198.2 R141.1 | length 1.4
  Top w0.25: C198.2@131.265,7.47 131.275,7.48 131.275,8.807 R141.1@131.285,8.817
NetC200_2: C200.2 IC10.11 | length 1.6
  Top w0.127: C200.2@126.073,54.026 126.269,54.222 IC10.11@127.575,54.222
NetC202_1: C202.1 J11.1 R225.2 | length 19.3
  Bot w0.152: R225.2@51.669,40.125 52.712,40.125 C202.1@52.803,40.035
  Bot w0.2: J11.1@40.951,50.199 40.951,48.269 42.031,47.19 44.244,47.19 45.784,45.65 45.784,42.06 47.719,40.125 R225.2@51.669,40.125
NetC202_2: C202.2 IC20.43 | length 2.7
  Bot w0.152: C202.2@53.703,40.035 54.241,40.035 54.856,40.65 54.856,40.756 55.5,41.4 IC20.43@55.5,41.675
NetC203_2: C203.2 IC20.44 | length 1.6
  Bot w0.152: C203.2@53.647,41.134 54.188,41.675 IC20.44@55,41.675
NetD1_3: D1.3 R23.2 R24.1 | length 4.5
  Top w0.125: v1(71.709,59.102) 71.742,59.134 R23.2@73.164,59.134 73.304,59.274 73.304,59.624 73.932,60.251 73.932,60.54 R24.1@74.072,60.68
  Bot w0.3: v1(71.709,59.102) 71.726,59.118 72.768,59.118 D1.3@72.784,59.134
NetD2_3: D2.3 R25.2 R26.1 | length 4.5
  Top w0.125: v1@71.759,64.06 v1(71.717,64.06) 71.756,64.022 72.014,64.022 72.227,63.809 R25.2@73.189,63.809 73.932,64.552 73.932,65.183 R26.1@74.072,65.323
  Bot w0.3: v1@71.734,64.076 D2.3@72.776,64.076
NetD3_3: D3.3 R27.2 R28.1 | length 5.7
  Top w0.125: v1(71.607,68.404) 73.117,68.404 R27.2@73.132,68.418 73.132,69.026 R28.1@74.072,69.966
  Bot w0.3: v1(71.607,68.404) 71.607,68.942 D3.3@72.784,70.119
NetD4_3: D4.3 R29.2 R30.1 | length 4.9
  Top w0.125: v1(71.742,73.009) 71.794,73.062 R29.2@73.132,73.062 73.132,73.672 73.566,74.106 73.568,74.106 R30.1@74.072,74.609
  Bot w0.3: v1(71.742,73.009) 71.78,73.048 71.78,73.221 72.584,74.025 D4.3@72.784,74.025
NetD5_3: D5.3 R31.2 R32.1 | length 5
  Top w0.125: v1(71.568,78.156) 72.019,77.705 R31.2@73.132,77.705 73.132,78.312 R32.1@74.072,79.252
  Bot w0.3: v1(71.568,78.156) 71.622,78.156 71.843,77.934 D5.3@72.784,77.934
NetD6_3: D6.3 R33.2 R34.1 | length 4.8
  Top w0.125: v1(71.86,82.348) R33.2@73.132,82.348 73.132,82.789 73.697,83.354 73.697,83.5 74.072,83.875 R34.1@74.072,83.895
  Bot w0.3: v1(71.86,82.348) 71.898,82.386 71.898,82.798 72.584,83.484 D6.3@72.784,83.484
NetD22_3: D22.3 J6.1 R82.2 R88.1 R92.1 | length 15.7
  Top w0.125: J6.1@1.75,44 6.145,44 R82.2@6.325,44.18 7.461,44.18 R88.1@7.556,44.084 ; R92.1@7.556,43.05 R88.1@7.556,44.084 ; v1(8.625,44.9) 8.307,44.582 8.034,44.582 7.556,44.104 R88.1@7.556,44.084
  Bot w0.125: v1(8.625,44.9) 8.96,45.235 D22.3@8.96,52.046
NetD22_4: D22.4 J5.1 R79.1 R80.2 R83.1 | length 13.9
  Top w0.125: J5.1@1.75,61 5.934,61 6.22,60.714 R83.1@6.24,60.714 7.04,60.714 7.33,61.004 R80.2@7.34,60.994 ; R80.2@7.35,61.004 7.35,59.634 v1(7.66,59.324)
  Bot w0.125: v1(7.66,59.324) 8.05,58.934 8.05,56.93 8.43,56.55 8.96,56.02 8.96,53.761 D22.4@8.96,53.626
NetD32_2: D32.2 IC21.3 IC23.3 R177.1 | length 139.4
  L3 w0.125: v1(44.679,72.492) 45.44,73.253 52.988,73.253 53.937,74.203 53.937,84.728 55.035,85.825 55.035,87.074 55.4,87.44 56.464,87.44 56.902,87.877 56.902,88.315 56.661,88.556 56.661,88.7 55.212,90.149 55.212,93.92 57.08,95.788 60.818,95.788 62.344,94.262 v1(99.895,94.262) 105.023,94.262 110.623,88.662 110.623,79.941 112.025,78.54 112.025,73.725 110.912,72.612 110.912,70.549 110.36,69.997 110.36,67.933 109.465,67.039 109.362,67.039 108.182,68.218 106.29,68.218 105.6,68.908 105.6,70.509 v1(104.436,71.673)
  Bot w0.125: D32.2@40.025,72.29 42.942,72.29 43.144,72.492 v1(44.679,72.492) ; v1(98.5,75.075) 98.5,74.6 98.8,74.3 R177.1@98.8,73.826 ; R177.1@98.85,73.776 104.086,73.776 104.556,73.306 104.556,71.792 v1(104.436,71.673)
  Bot w0.25: v1(98.5,75.075) IC21.3@98.5,77 ; v1(99.895,94.262) 100.313,93.844 IC23.3@101,93.844
NetIC3_11: IC3.11 R63.2 | length 3.2
  Top w0.125: IC3.11@41.32,42.259 41.5,42.439 41.5,43.773 v1(41.446,43.827)
  Bot w0.25: v1(41.446,43.827) 41.446,42.975 41.853,42.567 R63.2@41.981,42.567
NetIC3_17: IC3.17 R73.2 | length 2.1
  Top w0.25: v1(38.002,41.577) 38.05,41.529 38.218,41.529 38.549,41.198 IC3.17@38.562,41.198
  Bot w0.25: R73.2@37.636,40.367 38.002,40.732 v1(38.002,41.577)
NetIC4_2: IC4.2 R81.1 | length 1.5
  Top w0.125: IC4.2@12.298,59.425 13.705,59.425 R81.1@13.775,59.495
NetIC4_4: IC4.4 IC5.2 R79.2 | length 2.6
  Top w0.125: R79.2@8.206,60.05 8.206,60.07 8.434,60.297 8.454,60.297 8.531,60.375 IC4.4@9.698,60.375
  Bot w0.125: v1(8.81,60.431) 8.911,60.431 9.071,60.271 9.558,60.271 IC5.2@9.695,60.134
NetIC5_4: IC5.4 R87.1 | length 1.3
  Bot w0.125: IC5.4@11.795,60.784 11.795,61.238 12.346,61.789 R87.1@12.346,61.809
NetIC8_3: IC8.3 R125.2 | length 1.4
  Top w0.25: IC8.3@37.603,57.395 37.617,57.381 37.617,56.031 R125.2@37.632,56.016
NetIC8_4: IC8.4 R126.1 R127.2 | length 4
  Top w0.3: IC8.4@37.603,59.82 IC8.4@37.603,60.095 37.637,60.062 v1(38.425,60.062)
  Bot w0.3: R126.1@36.998,58.627 36.998,60.062 v1(38.425,60.062)
NetIC9_6: IC9.6 R219.2 R220.1 | length 3.3
  Top w0.2: R220.1@28.677,59.211 28.677,60.345 R219.2@28.85,60.519 28.913,60.456 30.163,60.456
  Top w0.25: 30.163,60.456 IC9.6@30.7,60.456
NetIC10_10: IC10.10 R131.2 R135.1 | length 2.8
  Top w0.203: R135.1@125.825,56.277 125.845,56.277 126.045,56.077 R131.2@126.045,55.322 126.045,55.302 126.475,54.872 IC10.10@127.575,54.872
NetIC10_12: IC10.12 R128.1 | length 2.8
  Top w0.203: R128.1@125.22,52.087 125.24,52.087 126.417,53.265 126.843,53.265 127.15,53.572 IC10.12@127.375,53.572
NetIC10_13: IC10.13 R129.1 | length 1.5
  Top w0.203: R129.1@126.275,52.172 126.463,52.361 126.834,52.361 127.145,52.672 IC10.13@127.575,52.672
NetIC11_1: IC11.1 R138.1 | length 2.3
  Top w0.127: IC11.1@126.877,7.47 127.397,7.47 127.533,7.334 v1(127.533,6.88)
  Bot w0.127: v1(127.533,6.88) 128.615,6.88 R138.1@128.655,6.84
NetIC11_4: IC11.4 R140.1 TP19.1 | length 10.8
  Top w0.127: IC11.4@126.877,8.97 126.895,8.97 126.957,9.031 v1(126.957,9.427) ; R140.1@130.027,14.865 v1(130.027,15.55) 130.027,16.247 TP19.1@130.475,16.695
  L4 w0.127: v1(126.957,9.427) 127.595,10.065 129.176,10.065 129.25,10.139 129.25,10.335 129.61,10.695 129.61,15.133 v1(130.027,15.55)
NetIC12_3: IC12.3 IC14.2 | length 93.8
  Top w0.127: IC14.2@60.651,13.503 60.675,13.479 v1(60.675,12.2)
  L3 w0.127: v1(60.675,12.2) 62.463,10.412 62.463,6.162 64.837,3.789 76.099,3.789 76.146,3.741 95.039,3.741 95.087,3.789 98.275,3.789 cw(c98.275,3.662) 98.277,3.789 116.745,3.541 116.751,3.535 126.827,3.535 126.88,3.588 127.605,3.588 ccw(c127.603,4.901) 127.609,3.588 135.875,3.625 137.05,4.8 137.05,11.355 IC12.3@139.2,13.505
NetIC13_1: IC13.1 R146.1 | length 2.4
  Top w0.203: IC13.1@57.254,19.803 57.272,19.822 57.272,21.361 v1(57.291,21.38)
  Bot w0.125: v1(57.291,21.38) R146.1@58.094,21.38
NetIC13_2: IC13.2 T8.3 | length 4.4
  Top w0.125: IC13.2@55.984,19.803 55.984,18.182 v1(57.048,17.118)
  Top w0.203: IC13.2@55.937,19.85 IC13.2@55.984,19.803
  Bot w0.125: v1(57.048,17.118) 57.064,17.102 T8.3@58.275,17.102
NetIC13_4: IC13.4 R144.1 R148.2 | length 15.2
  Top w0.127: v1(56.632,12.356) 56.731,12.356 57.254,12.878 IC13.4@57.254,13.503
  Bot w0.127: R148.2@47.045,15.888 47.231,15.702 R144.1@47.231,14.503 48.403,14.503 49.788,15.888 54.489,15.888 56.632,13.744 v1(56.632,12.356)
NetIC15_7: IC15.7 R130.2 R183.1 | length 8.8
  Top w0.203: v1(114.621,8.595) 114.648,8.568 114.648,7.897 IC15.7@114.675,7.87 ; R183.1@117.927,5.32 117.927,5.34 118.115,5.528 118.135,5.528 118.684,6.077 118.684,6.312 R130.2@118.872,6.5 ; R130.2@118.872,6.48 119.295,6.057 v1(119.295,5.979)
  L3 w0.203: v1(114.621,8.595) 115.916,7.3 115.916,7.215 117.153,5.979 v1(119.295,5.979)
NetIC16_6: IC16.6 R217.2 R218.1 | length 3.1
  Top w0.2: R218.1@57.634,55.275 57.614,55.275 57.324,55.565 R217.2@57.324,56.512 57.514,56.702 57.84,56.702 58.455,57.317 IC16.6@58.455,57.567
NetIC17_3: IC17.3 R165.2 | length 1.8
  Top w0.125: IC17.3@42.674,57.835 42.674,57.098 42.789,56.982 v1(42.789,56.912)
  Bot w0.125: v1(42.789,56.912) 42.789,57.722 R165.2@42.804,57.737
NetIC17_4: IC17.4 R166.1 R167.2 | length 5.6
  Top w0.3: IC17.4@42.674,60.535 43.338,60.535 43.744,60.13 v1(43.744,58.565)
  Bot w0.3: R166.1@42.096,59.715 43.744,59.715 v1(43.744,58.565)
NetIC18_6: IC18.6 R215.2 R216.1 | length 5.8
  Top w0.2: R215.2@50.706,53.497 R216.1@51.696,53.497 51.696,53.517 51.886,53.707 51.906,53.707 52.118,53.919 52.118,57.225 52.235,57.343 IC18.6@52.957,57.343
NetIC19_6: IC19.6 R212.2 R213.1 | length 6.2
  Top w0.2: R212.2@44.79,53.553 44.815,53.527 R213.1@45.742,53.527 45.742,56.709 46.015,56.982 47.081,56.982 47.131,57.032 IC19.6@47.131,57.542
NetIC20_5: IC20.5 Q1.3 | length 2.3
  Bot w0.125: Q1.3@52.025,43.925 52.488,44.388 53.212,44.388 53.45,44.625 IC20.5@54.05,44.625
NetIC20_6: IC20.6 Q1.1 | length 4.7
  Bot w0.125: Q1.1@49.825,45.625 50.65,44.8 52.9,44.8 53.225,45.125 IC20.6@54.05,45.125
NetIC20_36: IC20.36 R172.1 | length 1.6
  Bot w0.22: IC20.36@59,41.675 59,41.125 59.176,40.949 R172.1@59.176,40.172
NetIC21_6: IC21.6 R223.2 R224.1 | length 6.2
  Top w0.2: R224.1@96.393,77.476 R224.1@96.443,77.476 ; R223.2@96.868,76.42 96.793,76.495 96.793,77.126 R224.1@96.443,77.476 ; v1(96.975,81.411) 96.975,80.546 97.222,80.298 97.222,78.255 R224.1@96.443,77.476
  Bot w0.152: v1@96.975,81.484 97.416,81.484 IC21.6@97.5,81.4
NetIC22_2: IC22.2 R178.2 | length 4.2
  Top w0.3: IC22.2@137.61,87.436 137.61,85.84 138.2,85.25 R178.2@139.95,85.25
NetIC22_6: IC22.6 R176.1 R179.2 | length 7.3
  Bot w0.25: IC22.6@114.75,82.356 117.991,82.356 118.451,82.816 119.61,82.816 119.649,82.855 R176.1@119.649,80.699
NetIC23_4: IC23.4 R180.1 R181.2 | length 3.5
  Bot w0.5: R181.2@96.415,92.41 R180.1@96.415,93.994 96.54,93.869 98.275,93.869 IC23.4@98.3,93.844
NetIC24_1: IC24.1 R137.2 | length 2.1
  Top w0.203: IC24.1@118.862,25.998 119.306,25.998 v1(119.325,26.017)
  Bot w0.203: R137.2@118.862,27.408 118.882,27.408 119.07,27.219 119.07,27.199 119.325,26.945 v1(119.325,26.017)
NetIC24_4: IC24.4 L15.1 | length 3.8
  Top w0.203: L15.1@117.218,29.701 117.362,29.557 IC24.4@117.362,25.998
NetIC24_6: IC24.6 R200.2 | length 1.5
  Top w0.203: R200.2@116.218,21.935 116.238,21.935 116.839,22.536 116.839,23.134 IC24.6@116.862,23.158
NetIC24_9: IC24.9 R132.1 R182.2 | length 6.3
  Top w0.203: R132.1@113.668,23.803 R182.2@114.621,23.803 v1(114.621,23.215) ; v1(118.362,22.442) IC24.9@118.362,23.158
  L3 w0.203: v1(114.621,23.215) 117.589,23.215 v1(118.362,22.442)
NetIC25_1: IC25.1 R188.2 | length 1.7
  Top w0.203: IC25.1@129.155,24.313 129.155,24.33 129.179,24.353 v1(129.61,24.353)
  Bot w0.203: R188.2@129.035,25.283 129.055,25.283 129.553,24.785 129.553,24.41 v1(129.61,24.353)
NetIC25_4: IC25.4 L16.1 | length 3.8
  Top w0.203: L16.1@127.485,28.003 127.485,25.455 127.541,25.398 127.541,25.127 127.655,25.013 IC25.4@127.655,24.313
NetIC25_6: IC25.6 R205.2 | length 5.7
  Top w0.203: IC25.6@127.155,21.473 127.132,21.449 127.132,21.149 126.844,20.862 126.844,18.412 127.439,17.818 128.014,17.818 128.797,17.035 R205.2@128.797,17.015
NetIC25_9: IC25.9 R202.1 R204.2 | length 7.7
  Top w0.25: v1(123.98,21.399) R202.1@123.98,22.118 R204.2@124.865,22.118 ; IC25.9@128.655,21.473 128.655,20.866 128.732,20.789 v1(128.732,20.722)
  L4 w0.25: v1(123.98,21.399) 128.405,21.399 128.804,21 128.78,20.977 128.78,20.769 v1(128.732,20.722)
NetIC29_2: IC29.2 R89.1 | length 1.9
  Top w0.254: IC29.2@12.695,44.47 R89.1@14.55,44.47
NetIC29_4: IC29.4 IC30.2 R88.2 | length 3.2
  Top w0.125: R88.2@8.496,44.084 8.496,44.104 9.574,45.183 9.858,45.183 IC29.4@10.095,45.42
  Bot w0.125: v1(9.31,44.79) 10.27,44.79 IC30.2@10.345,44.865
NetIC30_4: IC30.4 R93.1 | length 1.4
  Bot w0.254: R93.1@12.378,46.84 12.445,46.773 IC30.4@12.445,45.515
NetIC31_21: IC31.21 R12.2 | length 2.4
  Top w0.16: R12.2@51.376,33.075 52.056,33.075 53.076,32.055 IC31.21@53.351,32.055
NetIC31_24: IC31.24 R11.2 | length 2.1
  Top w0.16: R11.2@51.376,30.285 51.914,30.285 52.166,30.536 53.333,30.536 IC31.24@53.351,30.555
NetIC31_27: IC31.27 R7.2 | length 2
  Top w0.16: R7.2@51.381,29.184 51.511,29.055 IC31.27@53.351,29.055
NetIC31_30: IC31.30 R10.2 | length 2.5
  Top w0.16: R10.2@51.376,26.39 51.926,26.39 53.091,27.555 IC31.30@53.351,27.555
NetIC31_32: IC31.32 R15.2 | length 3.8
  Top w0.125: v1(54.013,25.307) 54.601,25.895 IC31.32@54.601,26.805
  Bot w0.125: v1(54.013,25.307) 55.016,25.307 55.222,25.514 55.222,25.626 55.656,26.06 R15.2@55.676,26.06
NetIC31_33: IC31.33 R16.2 | length 5.7
  Top w0.125: v1(54.513,24.616) 55.101,25.204 IC31.33@55.101,26.805
  Bot w0.125: v1(54.513,24.616) 56.097,24.616 56.606,25.125 56.606,26.04 R16.2@56.626,26.06
NetIC33_27: IC33.27 R118.2 | length 1.7
  Bot w0.125: IC33.27@83.296,81.793 R118.2@84.978,81.794
NetIC36_1: IC36.1 IC37.1 R227.2 | length 205.7
  Top w0.127: v1(94.79,12.35) 94.844,12.296 95.231,12.296 95.297,12.23 95.317,12.23 95.543,12.003 R227.2@95.543,11.983 ; IC36.1@95.816,51.465 97.557,51.465 98.881,50.142 98.881,49.242 99.369,48.754 100.312,48.754 102.448,46.619 105.665,46.619 107.437,44.847 107.526,44.847 107.788,44.585 v1(107.888,44.585)
  L3 w0.127: v1(26.938,75.984) 26.938,45.607 25.259,43.928 25.259,39.793 24.944,39.479 24.944,30.618 26.2,29.362 v1(28.575,29.362) ; v1(94.79,12.35) 96.137,11.003 107.568,11.003 108.36,11.795 108.36,20.134 109.735,21.509 109.735,25.693 113.227,29.185 113.227,34.179 112.975,34.431 112.975,37.291 113.028,37.344 113.028,37.871 111.909,38.989 111.909,40.501 107.888,44.522 v1(107.888,44.585)
  L4 w0.127: v1(28.575,29.362) 34.214,29.362 38.002,25.574 38.002,16.402 39.526,14.878 60.064,14.878 65.061,9.881 68.834,9.881 71.622,12.669 94.471,12.669 v1(94.79,12.35)
  Bot w0.127: v1(26.938,75.984) 27.039,75.984 27.183,76.129 30.145,76.129 31.8,74.474 IC37.1@32.735,74.474
NetIC36_2: IC36.2 IC37.2 R229.2 | length 203.3
  Top w0.127: v1(94.79,13.049) R229.2@95.505,13.049 ; IC36.2@95.816,50.815 97.691,50.815 98.629,49.877 98.629,49.137 99.36,48.406 100.304,48.406 102.405,46.305 105.176,46.305 v1(107.013,44.469)
  L3 w0.127: v1(27.722,75.65) 27.722,45.865 25.511,43.654 25.511,39.689 25.196,39.374 25.196,30.785 26.258,29.724 27.935,29.724 v1(28.012,29.8) ; v1(94.79,13.049) 96.584,11.255 107.464,11.255 108.108,11.9 108.108,20.326 109.372,21.59 109.372,25.698 112.975,29.3 112.975,34.075 112.723,34.327 112.723,37.713 ; v1(107.013,44.469) 107.084,44.397 107.393,44.397 109.027,42.763 109.286,42.763 111.657,40.391 111.657,38.885 112.723,37.819 112.723,37.714
  L4 w0.127: v1(28.012,29.8) 28.392,29.8 ; 28.393,29.801 34.132,29.801 38.354,25.578 38.354,16.406 39.631,15.13 60.169,15.13 65.067,10.232 68.68,10.232 71.369,12.921 91.985,12.921 92.113,13.049 v1(94.79,13.049)
  Bot w0.254: v1(27.722,75.65) 27.73,75.658 30.17,75.658 31.422,74.405 31.422,74.005 31.604,73.824 IC37.2@32.735,73.824
NetIC36_3: IC36.3 IC37.3 LD20.1 R228.1 | length 201.4
  Top w0.125: v1(84.851,13.359) 84.851,14.149 LD20.1@85.357,14.656 ; IC36.3@95.816,50.165 97.732,50.165 98.314,49.583 98.314,48.887 99.046,48.155 100.2,48.155 100.869,47.486 100.869,47.455 102.369,45.955 104.694,45.955 105.653,44.996 v1(105.665,44.996)
  L3 w0.125: v1(27.407,30.162) 26.328,30.162 25.447,31.042 25.447,39.27 25.762,39.585 25.762,43.508 27.973,45.719 27.973,74.779 v1(28.35,75.156) ; v1(95.116,13.75) 95.174,13.692 95.174,13.614 95.783,13.005 95.783,12.573 96.85,11.506 107.36,11.506 107.857,12.004 107.857,20.687 109.121,21.951 109.121,25.802 111.975,28.655 111.975,34.629 111.475,35.129 111.475,36.522 110.414,37.583 110.414,40.837 108.726,42.524 108.136,42.524 v1(105.665,44.996)
  L4 w0.125: v1(27.407,30.162) 27.478,30.234 27.827,30.234 27.83,30.238 34.05,30.238 38.745,25.542 38.745,16.37 39.735,15.381 60.671,15.381 63.784,12.268 69.647,12.268 70.739,13.36 91.851,13.36 91.992,13.501 94.766,13.501 95.014,13.75 v1(95.116,13.75)
  Bot w0.125: v1(28.35,75.156) 28.954,75.156 29.066,75.268 29.568,75.268 31.662,73.174 IC37.3@32.735,73.174 33.971,73.174 R228.1@34.18,72.966
NetIC36_7: IC36.7 R230.2 | length 1.9
  Top w0.125: IC36.7@100.216,50.815 101.478,50.815 101.903,50.39 R230.2@101.923,50.39
NetIC37_7: IC37.7 R231.2 | length 1.8
  Bot w0.125: R231.2@26.75,73.296 26.77,73.296 27.299,73.824 IC37.7@28.335,73.824
NetJ1_4: J1.4 R4.2 R5.2 | length 5.8
  Bot w0.125: J1.4@3.2,18.245 3.338,18.108 5.553,18.108 6.399,17.262 6.399,16.331 R5.2@6.49,16.24 ; R4.2@6.53,15.275 6.546,15.291 6.546,15.699 6.674,15.828 6.674,16.136 6.53,16.28 6.55,16.28 R5.2@6.555,16.275
NetJ7_2: J7.2 R197.2 | length 12.4
  Bot w0.16: J7.2@21.21,15.84 23.724,18.354 26.926,18.354 27.908,19.335 31.761,19.335 31.825,19.272 31.855,19.272 32.065,19.062 R197.2@32.065,19.042
NetJ7_3: J7.3 R196.2 | length 11.7
  Bot w0.16: J7.3@21.21,17.87 22.786,17.87 23.611,18.695 26.78,18.695 27.756,19.671 31.855,19.671 32.065,19.881 R196.2@32.065,19.901
NetJ7_4: J7.4 R194.2 | length 11.2
  Bot w0.16: J7.4@21.21,19.901 21.437,19.674 22.451,19.645 ; 22.452,19.645 cw(c22.447,19.486) 22.527,19.624 25.549,19.624 27.586,21.661 31.001,21.661 31.065,21.597 31.095,21.597 31.305,21.387 R194.2@31.305,21.367
NetJ7_5: J7.5 R195.2 | length 12.3
  Bot w0.16: J7.5@21.21,21.933 22.177,20.966 22.177,20.378 22.645,19.909 25.32,19.909 27.393,21.981 31.001,21.981 31.065,22.045 31.095,22.045 31.305,22.255 R195.2@31.305,22.275
NetJ7_8: J7.8 R198.2 | length 8.6
  Bot w0.16: J7.8@23.75,14.82 23.934,14.82 26.376,17.262 30.713,17.262 30.895,17.08 30.915,17.08 31.125,16.87 R198.2@31.125,16.85
NetJ7_9: J7.9 R199.2 | length 8.3
  Bot w0.16: J7.9@23.75,16.85 24.049,16.85 24.635,16.264 24.975,16.264 26.32,17.609 30.91,17.609 31.12,17.819 R199.2@31.12,17.839
NetJ7_10: J7.10 R95.2 | length 10.2
  Bot w0.16: J7.10@23.75,20.917 25.07,22.237 25.07,23.054 25.562,23.546 32.284,23.546 R95.2@32.325,23.505
NetJ7_11: J7.11 R94.2 | length 9.2
  Bot w0.16: J7.11@23.75,22.949 23.769,22.949 24.651,23.831 31.681,23.831 32.095,24.245 32.115,24.245 32.325,24.455 R94.2@32.325,24.475
NetJ7_16: J7.16 R85.2 | length 3.8
  Bot w0.254: J7.16@26.21,15.279 29.594,15.279 29.725,15.148 29.745,15.148 29.908,14.985 R85.2@29.908,14.965
NetJ7_18: J7.18 R91.2 | length 3.2
  Bot w0.125: J7.18@26.21,24.931 29.324,24.931 R91.2@29.355,24.9
NetJB1_98: JB1.98 R2.2 | length 13.6
  Top w0.125: v1(117.455,33.474) 117.475,33.494 JB1.98@117.475,34.704
  Bot w0.125: v1(117.455,33.474) 123.485,33.474 125.347,31.612 125.347,30.93 127.437,28.84 R2.2@127.437,28.82
NetJB1_100: JB1.100 R3.2 | length 11.1
  Top w0.125: JB1.100@117.975,34.704 118.404,34.704 v1(118.75,35.05)
  Bot w0.152: v1(118.75,35.05) 119.597,34.203 124.326,34.203 126.942,31.587 127.343,31.587 R3.2@127.437,31.681
NetLD1_1: LD1.1 R96.1 | length 7.8
  Top w0.16: LD1.1@2.5,28.95 3.548,28.95 4.603,30.005 8.205,30.005 9.375,31.175 R96.1@9.425,31.175
NetLD1_3: LD1.3 R97.1 | length 4.3
  Top w0.16: LD1.3@7.58,28.95 8.655,30.025 9.77,30.025 10.92,31.175 R97.1@10.97,31.175
NetLD2_1: LD2.1 R98.1 | length 2.9
  Top w0.125: LD2.1@2.5,76.5 4,75 R98.1@4,74.261
NetLD2_3: LD2.3 R99.1 | length 2.3
  Top w0.125: LD2.3@7.58,76.5 7.58,74.395 R99.1@7.75,74.225
NetLD4_1: LD4.1 T3.3 | length 3.1
  Top w0.25: v1(73.75,5.304) 74.404,4.65 74.725,4.65 LD4.1@75,4.375
  Bot w0.152: v1(73.75,5.304) 74.237,4.818 74.947,4.818 T3.3@74.982,4.783
NetLD4_2: LD4.2 R104.1 | length 1.1
  Top w0.25: LD4.2@75,6.025 R104.1@75,7.167
NetLD5_1: LD5.1 T4.3 | length 5.9
  Top w0.25: LD5.1@60.263,66.64 v1(61.191,66.64)
  Bot w0.152: T4.3@59.305,70.096 60.609,70.096 61.191,69.514 v1(61.191,66.64)
NetLD5_2: LD5.2 R105.1 | length 2.1
  Top w0.25: v1(57.693,66.64) LD5.2@58.613,66.64
  Bot w0.3: v1(57.693,66.64) R105.1@58.835,66.64
NetLD6_2: LD6.2 R106.1 | length 2.1
  Top w0.254: v1(30.7,69.365) 30.748,69.412 30.748,69.541 LD6.2@31.252,70.045
  Bot w0.254: v1(30.7,69.365) 30.767,69.365 30.96,69.558 31.265,69.558 31.588,69.881 R106.1@31.588,69.931
NetLD7_2: LD7.2 R108.2 | length 2.6
  Top w0.16: v1(46.096,66.541) 47.211,66.541 LD7.2@47.213,66.539
  Bot w0.152: v1(46.096,66.541) v1@46.098,66.539
  Bot w0.25: v1@46.098,66.539 R108.2@47.568,66.539
NetLD8_2: LD8.2 R107.1 | length 1.1
  Top w0.25: LD8.2@88.545,6.03 R107.1@88.545,7.122
NetLD9_1: LD9.1 R109.1 | length 1.1
  Top w0.25: R109.1@78.601,7.122 78.614,7.109 LD9.1@78.614,6.046
NetLD10_2: LD10.2 R110.2 | length 1.1
  Top w0.25: LD10.2@93.191,6.03 R110.2@93.191,7.122
NetLD11_1: LD11.1 R111.1 | length 1.8
  Top w0.3: LD11.1@35.553,66.201 35.553,67.024 v1(35.569,67.04)
  Bot w0.3: v1(35.569,67.04) 35.569,66.263 R111.1@35.703,66.129
NetLD12_2: LD12.2 R112.2 | length 2.2
  Top w0.3: v1(52.078,66.541) 52.08,66.539 LD12.2@53.009,66.539
  Bot w0.3: v1(52.078,66.541) 52.079,66.54 53.363,66.54 R112.2@53.364,66.539
NetLD13_1: LD13.1 R113.1 | length 2.1
  Top w0.16: v1(42.822,65.274) 42.824,65.276 LD13.1@42.824,66.231
  Bot w0.25: R113.1@42.469,66.231 42.469,65.628 v1(42.822,65.274)
NetLD14_2: LD14.2 R114.2 | length 1.1
  Top w0.25: LD14.2@85.02,6.024 R114.2@85.02,7.122